# EAGLE board 555 Circut (EAGLE 9.7.0)

Size 142.39 x 67.06 mm. Coordinates in mm from the lower left corner, seen from the top.
Outline: 0,0 142.39,0 142.39,67.06 0,67.06 0,0
Copper layers (1*16): Top 0.035mm / dielectric 1.5mm / Bottom 0.035mm
Design rules "default": minimum track width 6mil, minimum drill 0.35mm, track to track 6mil, track to pad 6mil, pad to pad 6mil, via to via 6mil, smd to smd 6mil, copper to edge 40mil, drill to drill 6mil, minimum pad ring 10mil, minimum via ring 8mil, stop-mask expansion 4mil, vias tented up to drill 0mil, thermal gap 10mil

## Footprints (pad centres in the part's own frame; a part is rotated, then mirrored left to right if it is on the bottom)
BATTERY-GENERIC = drill 1.118 pad 3.15 octagon: + 2.54,0; - -2.54,0
CAPPRD254W65D500H1150B = drill 0.85 pad 1.45: 1 -1.27,0; 2 1.27,0
LEDRD254W60D565H860B = drill 0.981 pad 1.581: 1 -1.27,0; 2 1.27,0
RESAD1016W63L850D250B = drill 0.83 pad 1.43: 1 -5.08,0; 2 5.08,0
SWITCH-MOMENTARY-PTH-6.5MM = drill 1.016 pad 1.88: 1 -3.251,2.261; 2 3.251,2.261; 3 -3.251,-2.261; 4 3.251,-2.261
DIP826W53P254L959H508Q8B = drill 0.786 pad 1.386: 1 -4.13,3.81; 2 -4.13,1.27; 3 -4.13,-1.27; 4 -4.13,-3.81; 5 4.13,-3.81; 6 4.13,-1.27; 7 4.13,1.27; 8 4.13,3.81

## Placement (x,y rotation side)
BAT1  9V  [BATTERY-GENERIC]  8.26,37.39 270 top
C1  10u  [CAPPRD254W65D500H1150B]  121.55,58.7 180 top
C2  0.01u  [CAPPRD254W65D500H1150B]  136.66,59.24 0 top
D1  RED  [LEDRD254W60D565H860B]  71.36,24.21 180 top
R2  100k  [RESAD1016W63L850D250B]  110.73,44.53 90 top
R3  10k  [RESAD1016W63L850D250B]  54.85,8.97 90 top
R5  330  [RESAD1016W63L850D250B]  90.41,21.67 0 top
S1  SWITCH_MOMENTARY  [SWITCH-MOMENTARY-PTH-6.5MM]  52.31,28.02 90 top
U1  LM555_DIP  [DIP826W53P254L959H508Q8B]  112,28.02 90 top

## Library data of the parts
BAT1 C1 C2 R2 R3 R5 S1 = Tinkercad
D1 = Tinkercad; CATEGORY: Opto-Electronic; SUB-CATEGORY: LED; VALUE: LED_RED
U1 = Tinkercad; CATEGORY: IC_Clock-Timing; CURRENT-SUPPLY: 10mA; DESCRIPTION: IC OSC SINGLE TIMER 100KHZ 8-DIP; FREQUENCY: 100kHz; MANUFACTURER: Texas Instruments; MPN: LM555CN/NOPB; OPERATING_TEMP: 0°C to 70°C; PART_STATUS: Active; ROHS_COMPLIANT: ROHS3 Compliant; SUB-CATEGORY: Timer

## Nets
BAT1+: BAT1.+ R2.2 R3.1 S1.1 S1.2 U1.4 U1.8
BAT1-: BAT1.- C1.2 C2.2 D1.2 U1.1
D1_A: D1.1 R5.1
U1_CV: C2.1 U1.5
U1_OUT: R5.2 U1.3
U1_THR: C1.1 R2.1 U1.6 U1.7
U1_TR: R3.2 S1.3 S1.4 U1.2

## Tracks (layer width: path | path; a pad name or v marks a point on that pad's centre or on a via)
BAT1+  (6 unrouted)
BAT1-  (4 unrouted)
D1_A  (1 unrouted)
U1_CV  (1 unrouted)
U1_OUT  (1 unrouted)
U1_THR  (3 unrouted)
U1_TR  (3 unrouted)